# Altium PCB PCB1.PcbDoc (part 2 of 2)
Units mil, origin at the board's own origin, x right, y up, seen from the top; angles counter-clockwise.
Board outline 6000 x 4000 mil, 2 copper layers (Top Layer, Bottom Layer); 89 components, 126 nets, 437 pads, 0 vias.
Unrouted connection lines stored in the file: 287.
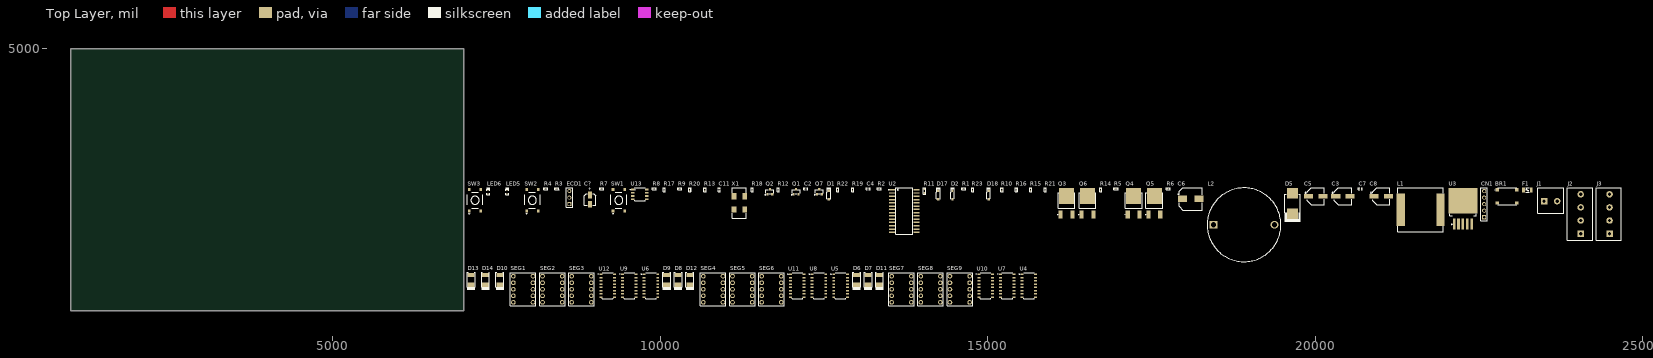
[diagram p0: Top Layer view]

## Part data (continued)
R15 R17 R19 R21 R22: library part RC0402FR-071K5L, "RES 1.5K OHM 1% 1/16W 0402", Case Code (Imperial)=0402, Case Code (Metric)=1005, LCSC Part Number=C114759, Manufacturer=Yageo, Max Operating Temperature=155°C, Max Power Dissipation=63mW, Min Operating Temperature=-55°C, Package Quantity=1, Power Rating=62.5mW, Resistance=1.5kR, Resistance Tolerance=1%, Resistor Type="Thick Film", Supplier Part Number 1=311-1.50KLRCT-ND, Temperature Coefficient=100ppm/°C, Voltage Rating=50V, Case/Package=0402, Category="Chip SMD Resistors", ComponentLink1Description=https://datasheet.ciiva.com/11808/0900766b80c66297-11808238.pdf?src-supplier=RSComponents, ComponentLink1URL=https://datasheet.ciiva.com/11808/0900766b80c66297-11808238.pdf?src-supplier=RSComponents, ComponentLink2Description=https://datasheet.ciiva.com/46394/1018594-46394950.pdf?src-supplier=Element14, ComponentLink2URL=https://datasheet.ciiva.com/46394/1018594-46394950.pdf?src-supplier=Element14, ComponentLink3Description=https://datasheet.ciiva.com/2453/pyu-r-int-thick-7-2453440.pdf?src-supplier=Digi-Key, ComponentLink3URL=https://datasheet.ciiva.com/2453/pyu-r-int-thick-7-2453440.pdf?src-supplier=Digi-Key, ComponentLink4Description=https://datasheet.ciiva.com/2453/pyu-r-int-thick-7-2453441.pdf?src-supplier=Digi-Key, ComponentLink4URL=https://datasheet.ciiva.com/2453/pyu-r-int-thick-7-2453441.pdf?src-supplier=Digi-Key, ComponentLink5Description=https://datasheet.ciiva.com/2453/pyu-r-int-thick-7-2453439.pdf?src-supplier=Digi-Key, ComponentLink5URL=https://datasheet.ciiva.com/2453/pyu-r-int-thick-7-2453439.pdf?src-supplier=Digi-Key, ComponentLink6Description=https://datasheet.ciiva.com/12558/pyu-rc0402-51-rohs-l-6-r-8721-12558542.pdf?src-supplier=Mouser, ComponentLink6URL=https://datasheet.ciiva.com/12558/pyu-rc0402-51-rohs-l-6-r-8721-12558542.pdf?src-supplier=Mouser, ComponentLink7Description=https://datasheet.ciiva.com/7849/1018594-7849863.pdf?src-supplier=Element14, ComponentLink7URL=https://datasheet.ciiva.com/7849/1018594-7849863.pdf?src-supplier=Element14, ComponentLink8Description=https://datasheet.ciiva.com/7849/1018594-7849864.pdf?src-supplier=Element14, ComponentLink8URL=https://datasheet.ciiva.com/7849/1018594-7849864.pdf?src-supplier=Element14, ComponentLink9Description=https://datasheet.ciiva.com/15189/getdatasheetpartid-323992-15189370.pdf?src-supplier=Verical, ComponentLink9URL=https://datasheet.ciiva.com/15189/getdatasheetpartid-323992-15189370.pdf?src-supplier=Verical, Construction=Rectangular, Depth=0.5mm, Features="Moisture Resistant", Height=0.016inch, Lead Free="Lead Free", Length=1mm, Manufacturer Part Number=RC0402FR-071K5L, Military Standard=Not, Number of Terminations=2, Packaging="Tape and Reel", Pricing 1="1=0.10000, 10=0.01500, 100=0.00610, 1000=0.00275, 2500=0.00239, 5000=0.00197 (USD)", REACH SVHC="No SVHC", RoHS=Yes, RoHS Compliant=Yes, Series=RC, Size Code=0402, Stock 1=2832947, Supplier 1=Digi-Key, Technology="THICK FILM", Termination=SMD/SMT, Tolerance=1%, Width=0.02inch
R18: library part RC0402FR-0710KL, "RES 10K OHM 1% 1/16W 0402", Case Code (Imperial)=0402, Case Code (Metric)=1005, LCSC Part Number=C60490, Manufacturer=Yageo, Max Operating Temperature=155°C, Max Power Dissipation=63mW, Min Operating Temperature=-55°C, Power Rating=62.5mW, Resistance=10kR, Resistance Tolerance=1%, Resistor Type="Thick Film", Supplier Part Number 1=603-RC0402FR-0710KL, Temperature Coefficient=100ppm/°C, Voltage Rating=50V, Case/Package=0402, Category="Chip SMD Resistors", ComponentLink1Description=https://datasheet.ciiva.com/7660/38568-7660787.pdf?src-supplier=Element14, ComponentLink1URL=https://datasheet.ciiva.com/7660/38568-7660787.pdf?src-supplier=Element14, ComponentLink2Description=https://datasheet.ciiva.com/7849/1686128-7849814.pdf?src-supplier=Element14, ComponentLink2URL=https://datasheet.ciiva.com/7849/1686128-7849814.pdf?src-supplier=Element14, ComponentLink3Description=https://datasheet.ciiva.com/7983/1018594-7983486.pdf?src-supplier=Element14, ComponentLink3URL=https://datasheet.ciiva.com/7983/1018594-7983486.pdf?src-supplier=Element14, ComponentLink4Description=https://datasheet.ciiva.com/22747/1018594-22747512.pdf?src-supplier=Element14, ComponentLink4URL=https://datasheet.ciiva.com/22747/1018594-22747512.pdf?src-supplier=Element14, ComponentLink5Description=https://datasheet.ciiva.com/12667/pyu-rc0402-51-rohs-l-6-r-12667067.pdf?src-supplier=Mouser, ComponentLink5URL=https://datasheet.ciiva.com/12667/pyu-rc0402-51-rohs-l-6-r-12667067.pdf?src-supplier=Mouser, ComponentLink6Description=https://datasheet.ciiva.com/7849/1784430-7849813.pdf?src-supplier=Element14, ComponentLink6URL=https://datasheet.ciiva.com/7849/1784430-7849813.pdf?src-supplier=Element14, ComponentLink7Description=https://datasheet.ciiva.com/7849/1784430-7849815.pdf?src-supplier=Element14, ComponentLink7URL=https://datasheet.ciiva.com/7849/1784430-7849815.pdf?src-supplier=Element14, Construction=Rectangular, Depth=0.5mm, Features="Moisture Resistant", Height=0.32mm, Item Type=Resistor, Lead Free="Lead Free", Lead Pitch=0.2mm, Length=1mm, Manufacturer Part Number=RC0402FR-0710KL, Military Standard=Not, Number of Pins=2, Number of Terminations=2, Packaging="Tape and Reel", Pricing 1="1=0.10000, 10=0.01400, 50=0.01400, 100=0.00500, 1000=0.00300, 10000=0.00200 (USD)", REACH SVHC="No SVHC", RoHS=Yes, RoHS Compliant=Yes, Series=RC, Stock 1=18648329, Supplier 1=Mouser, Termination=SMD/SMT, Tolerance=1%, Voltage Rating (DC)=50V, Width=0.5mm, Working Voltage=50V
SEG1 SEG2 SEG3 SEG4 SEG5 SEG6 SEG7 SEG8 SEG9: "DISPLAY 7SEG 0.39\" SGL RED 10DIP", Manufacturer=Kingbright, Supplier Part Number=SC39-11SURKWA-ND, ComponentLink1Description=https://datasheet.ciiva.com/26291/sc39-11surkwa-26291740.pdf?src-supplier=Digikey, ComponentLink1URL=https://datasheet.ciiva.com/26291/sc39-11surkwa-26291740.pdf?src-supplier=Digikey, ComponentLink2Description=https://datasheet.ciiva.com/16375/sc39-11surkwa-246106-16375578.pdf?src-supplier=Mouser, ComponentLink2URL=https://datasheet.ciiva.com/16375/sc39-11surkwa-246106-16375578.pdf?src-supplier=Mouser, ComponentLink3Description=https://datasheet.ciiva.com/1317/1519922-1317612.pdf?src-supplier=Newark, ComponentLink3URL=https://datasheet.ciiva.com/1317/1519922-1317612.pdf?src-supplier=Newark, ComponentLink4Description=https://datasheet.ciiva.com/29367/001050548-da-01-en-led-anzeige-7-seg-rot-sc39-11surkwa-29367379.pdf?src-supplier=Conrad, ComponentLink4URL=https://datasheet.ciiva.com/29367/001050548-da-01-en-led-anzeige-7-seg-rot-sc39-11surkwa-29367379.pdf?src-supplier=Conrad, ComponentLink5Description=https://datasheet.ciiva.com/1535/1519922-1535149.pdf?src-supplier=Element14, ComponentLink5URL=https://datasheet.ciiva.com/1535/1519922-1535149.pdf?src-supplier=Element14, Item Type="LED Displays", Manufacturer Part Number=SC39-11SURKWA, Pricing="1=1.86, 39=1.23821, 117=0.95282, 507=0.86132, 1014=0.74021, 2028=0.69983, 5031=0.68368, 10023=0.67291 (USD)", RoHS=Yes, Stock=3214, Supplier=Digikey
SW1 SW2 SW3: "-25℃~+85℃ 6mm 5mm Round Button 50mA Brick nogging 6mm SPST 100MΩ 100000 250gf@±30gf 12V SMD Tactile Switches ROHS", LCSC Part Number=C127509, Manufacturer="Korean Hroparts Elec", Package=SMD, ComponentLink1Description=LCSC, ComponentLink1URL=https://www.lcsc.com/product-detail/span-style-background-color-ff0-Tactile-span-Switches_Korean-Hroparts-Elec-K2-1102SP-C4SC-04_C127509.html, Item Type=Switch, Manufacturer Part Number=K2-1102SP-C4SC-04
U2: "IC MCU 8BIT 7KB FLASH 28SOIC", Manufacturer="Microchip Technology", Package=28-SOIC, ComponentLink1Description=LCSC, ComponentLink1URL=https://www.digikey.com/en/products/detail/microchip-technology/PIC16F873A-I-SO/446135, Item Type=IC, Manufacturer Part Number=PIC16F873A-I/SO
U3: "IC REG BUCK 5V 3A TO263-5", Case/Package=TO-263-6, LCSC Part Number=C34465, Manufacturer="TI National Semiconductor", Max Operating Temperature=125°C, Max Supply Voltage=40V, Min Input Voltage=4V, Min Operating Temperature=-40°C, Nominal Output Voltage=5V, Output Current=3A, Quiescent Current=5mA, Supplier Part Number 1=926-LM2576SX-5.0NOPB, Switching Frequency=52kHz, Category="Voltage Regulators - Switching", ComponentLink1Description=https://datasheet.ciiva.com/41457/001013741-da-01-en-ic-reg-bu-lm2576sx-5-0-nopb-to-263-5-tid-41457614.pdf?src-supplier=Conrad, ComponentLink1URL=https://datasheet.ciiva.com/41457/001013741-da-01-en-ic-reg-bu-lm2576sx-5-0-nopb-to-263-5-tid-41457614.pdf?src-supplier=Conrad, Efficiency=77%, Item Type=IC, Lead Free="Contains Lead", Manufacturer Part Number=LM2576SX-5.0/NOPB, Mounting Technology="Surface Mount", Number of Outputs=1, Output Type=Fixed, Output Voltage=5V, Packaging="Tape and Reel", Pins=5, Pricing 1="1=4.06000, 10=3.64000, 50=3.44000, 100=2.98000, 1000=2.54000, 10000=2.54000 (USD)", Reach SVHC Compliant=No, RoHS=Yes, RoHS Compliant=Yes, Series="SIMPLE SWITCHER®", Stock 1=734, Supplier 1=Mouser, Synchronous Rectifier=No
U4 U5 U6 U7 U8 U9 U10 U11 U12: "IC 8BIT SHFT REG OUT LTCH 16SOIC", Manufacturer="Texas Instruments", Supplier Part Number=595-SN74LS595DR, ComponentLink1Description=https://datasheet.ciiva.com/14296/sn74ls595-14296811.pdf?src-supplier=Avnet, ComponentLink1URL=https://datasheet.ciiva.com/14296/sn74ls595-14296811.pdf?src-supplier=Avnet, ComponentLink2Description=https://datasheet.ciiva.com/1886/sn74ls595-1886573.pdf?src-supplier=Digikey, ComponentLink2URL=https://datasheet.ciiva.com/1886/sn74ls595-1886573.pdf?src-supplier=Digikey, ComponentLink3Description=https://datasheet.ciiva.com/1886/sn74ls595-1886574.pdf?src-supplier=Digikey, ComponentLink3URL=https://datasheet.ciiva.com/1886/sn74ls595-1886574.pdf?src-supplier=Digikey, ComponentLink4Description=https://datasheet.ciiva.com/1886/sn74ls595-1886575.pdf?src-supplier=Digikey, ComponentLink4URL=https://datasheet.ciiva.com/1886/sn74ls595-1886575.pdf?src-supplier=Digikey, Item Type=IC, Manufacturer Part Number=SN74LS595DR, Pricing="1=11.61, 10=10.48, 50=10, 100=8.68, 1000=6.58, 10000=6.34 (USD)", RoHS=Yes, Stock=2196, Supplier=Mouser
U13: "IC OPAMP GP 2 CIRCUIT 8SOIC", Manufacturer=STMicroelectronics, Supplier Part Number=511-LM358DT, ComponentLink1Description=https://datasheet.ciiva.com/15129/getdatasheetpartid-39583-15129679.pdf?src-supplier=Verical, ComponentLink1URL=https://datasheet.ciiva.com/15129/getdatasheetpartid-39583-15129679.pdf?src-supplier=Verical, ComponentLink2Description=https://datasheet.ciiva.com/29306/155599-da-01-en-op-verst-lm358dt-stm-29306826.pdf?src-supplier=Conrad, ComponentLink2URL=https://datasheet.ciiva.com/29306/155599-da-01-en-op-verst-lm358dt-stm-29306826.pdf?src-supplier=Conrad, ComponentLink3Description=https://datasheet.ciiva.com/14544/70013561-14544747.pdf?src-supplier=Allied+Electronics, ComponentLink3URL=https://datasheet.ciiva.com/14544/70013561-14544747.pdf?src-supplier=Allied+Electronics, ComponentLink4Description=https://datasheet.ciiva.com/16371/cd00000464-16371207.pdf?src-supplier=Future+Electronics, ComponentLink4URL=https://datasheet.ciiva.com/16371/cd00000464-16371207.pdf?src-supplier=Future+Electronics, ComponentLink5Description=https://datasheet.ciiva.com/1795/cd00000464-1795490.pdf?src-supplier=Digikey, ComponentLink5URL=https://datasheet.ciiva.com/1795/cd00000464-1795490.pdf?src-supplier=Digikey, ComponentLink6Description=https://datasheet.ciiva.com/1795/cd00000464-1795491.pdf?src-supplier=Digikey, ComponentLink6URL=https://datasheet.ciiva.com/1795/cd00000464-1795491.pdf?src-supplier=Digikey, ComponentLink7Description=https://datasheet.ciiva.com/1795/cd00000464-1795492.pdf?src-supplier=Digikey, ComponentLink7URL=https://datasheet.ciiva.com/1795/cd00000464-1795492.pdf?src-supplier=Digikey, Item Type=Opam, Manufacturer Part Number=LM358DT, Pricing="1=0.39, 10=0.266, 50=0.266, 100=0.155, 1000=0.097, 10000=0.074 (USD)", RoHS=Yes, Stock=69809, Supplier=Mouser
X1: "CRYSTAL 4.0000MHZ 20PF SMD", Manufacturer="ECS International", Supplier Part Number=XC587CT-ND, Item Type=Crystals, Manufacturer Part Number=ECS-40-20-18-TR, Pricing="1=2.5, 10=2.439, 50=2.323, 100=2.0326, 500=1.97456 (USD)", RoHS=Yes, Stock=10131, Supplier=Digikey

## Nets (pads, with @x,y where several pads share a name; then routed paths per layer and width w, separated by ;. In a path a pad name is that pad's centre, name@x,y a point inside that pad or via, vN(x,y) a via of type N, cw(c..) or ccw(c..) an arc to the next point about the centre after c; other vN are vias at no path point)
2Va: D10.2 SEG1.3 SEG1.8 SEG2.3 SEG2.8 SEG3.3 SEG3.8
2Vb: D12.2 SEG4.3 SEG4.8 SEG5.3 SEG5.8 SEG6.3 SEG6.8
2Vc: D11.2 SEG7.3 SEG7.8 SEG8.3 SEG8.8 SEG9.3 SEG9.8
+24V: BR1.1 C7.2 C8.1 J3.2 L2.1 R5.2 R6.2 U3.1
C: CN1.5 U2.27
D: CN1.4 U2.28
EC1: ECD1.3 U2.22
EC2: ECD1.1 U2.23
ERR: U2.25 U13.1
FB: C2.2 C3.1 C5.1 CN1.2 L1.2 R1.2 R2.1 R3.1 R4.1 R8.2 R18.2 R20.2 U2.20 U3.4 U4.10 U4.16 U5.10 U5.16 U6.9 U6.10 U6.16 U7.10 U7.16 U8.10 U8.16 U9.9 U9.10 U9.14 U9.16 U10.10 U10.16 U11.10 U11.16 U12.9 U12.10 U12.14 U12.16 U13.8
GND: BR1.3 C2.1 C3.2 C4.1 C5.2 C6.2 C7.1 C8.2 C11.1 C?.2 CN1.1 D5.2 D6.1 D9.1 D13.1 ECD1.2 J2.1 J2.2 Q1.2 Q2.2 Q7.2 R7.1 R10.1 R11.1 R16.1 R17.1 SW1.3 SW1.4 SW2.3 SW2.4 SW3.3 SW3.4 U2.8 U2.19 U3.3 U3.5 U3.6 U4.8 U4.13 U5.8 U5.13 U6.8 U6.13 U7.8 U7.13 U8.8 U8.13 U9.8 U9.13 U10.8 U10.13 U11.8 U11.13 U12.8 U12.13 U13.4
GS: SW1.1 SW1.2 U2.21
MCLR: CN1.3 R1.1 SW3.1 SW3.2 U2.1
MD: D17.2 U2.12 U13.6
MOF: R12.2 U2.5
NetBR1_2: BR1.2 F1.1
NetBR1_4: BR1.4 J3.4
NetC6_1: C6.1 L2.2 Q4.3 Q5.3
NetC?_1: C?.1 R9.1 U13.2
NetD1_1: D1.1 D18.1 Q6.1 R16.2 R19.2
NetD1_2: D1.2 D2.2 Q2.3
NetD2_1: D2.1 D17.1 Q3.1 R10.2 R21.2
NetD5_1: D5.1 L1.1 U3.2
NetD6_2: D6.2 D7.1
NetD7_2: D7.2 D11.1
NetD8_1: D8.1 D9.2
NetD8_2: D8.2 D12.1
NetD10_1: D10.1 D14.2
NetD13_2: D13.2 D14.1
NetD18_2: D18.2 R13.1 U13.7
NetF1_2: F1.2 J3.3
NetJ2_4: J2.4 Q3.2 Q4.2
NetJ3_1: J3.1 Q5.2 Q6.2
NetLED5_1: LED5.1 R3.2
NetLED6_1: LED6.1 R4.2
NetQ1_1: Q1.1 R13.2
NetQ1_3: Q1.3 Q7.1 R23.1
NetQ2_1: Q2.1 R12.1
NetQ3_3: Q3.3 Q6.3 R9.2 R11.2
NetQ4_1: Q4.1 R5.1 R23.2
NetQ5_1: Q5.1 R6.1 R14.2
NetQ7_3: Q7.3 R14.1
NetR7_2: R7.2 R8.1 U13.3
NetR15_2: R15.2 R21.1
NetR17_2: R17.2 R20.1 U13.5
NetR19_1: R19.1 R22.2
NetSEG1_1: SEG1.1 U12.6
NetSEG1_2: SEG1.2 U12.5
NetSEG1_4: SEG1.4 U12.4
NetSEG1_5: SEG1.5 U12.3
NetSEG1_7: SEG1.7 U12.2
NetSEG1_9: SEG1.9 U12.1
NetSEG1_10: SEG1.10 U12.15
NetSEG2_1: SEG2.1 U9.6
NetSEG2_2: SEG2.2 U9.5
NetSEG2_4: SEG2.4 U9.4
NetSEG2_5: SEG2.5 U9.3
NetSEG2_7: SEG2.7 U9.2
NetSEG2_9: SEG2.9 U9.1
NetSEG2_10: SEG2.10 U9.15
NetSEG3_1: SEG3.1 U6.6
NetSEG3_2: SEG3.2 U6.5
NetSEG3_4: SEG3.4 U6.4
NetSEG3_5: SEG3.5 U6.3
NetSEG3_7: SEG3.7 U6.2
NetSEG3_9: SEG3.9 U6.1
NetSEG3_10: SEG3.10 U6.15
NetSEG4_1: SEG4.1 U11.6
NetSEG4_2: SEG4.2 U11.5
NetSEG4_4: SEG4.4 U11.4
NetSEG4_5: SEG4.5 U11.3
NetSEG4_7: SEG4.7 U11.2
NetSEG4_9: SEG4.9 U11.1
NetSEG4_10: SEG4.10 U11.15
NetSEG5_1: SEG5.1 U8.6
NetSEG5_2: SEG5.2 U8.5
NetSEG5_4: SEG5.4 U8.4
NetSEG5_5: SEG5.5 U8.3
NetSEG5_7: SEG5.7 U8.2
NetSEG5_9: SEG5.9 U8.1
NetSEG5_10: SEG5.10 U8.15
NetSEG6_1: SEG6.1 U5.6
NetSEG6_2: SEG6.2 U5.5
NetSEG6_4: SEG6.4 U5.4
NetSEG6_5: SEG6.5 U5.3
NetSEG6_7: SEG6.7 U5.2
NetSEG6_9: SEG6.9 U5.1
NetSEG6_10: SEG6.10 U5.15
NetSEG7_1: SEG7.1 U10.6
NetSEG7_2: SEG7.2 U10.5
NetSEG7_4: SEG7.4 U10.4
NetSEG7_5: SEG7.5 U10.3
NetSEG7_7: SEG7.7 U10.2
NetSEG7_9: SEG7.9 U10.1
NetSEG7_10: SEG7.10 U10.15
NetSEG8_1: SEG8.1 U7.6
NetSEG8_2: SEG8.2 U7.5
NetSEG8_4: SEG8.4 U7.4
NetSEG8_5: SEG8.5 U7.3
NetSEG8_7: SEG8.7 U7.2
NetSEG8_9: SEG8.9 U7.1
NetSEG8_10: SEG8.10 U7.15
NetSEG9_1: SEG9.1 U4.6
NetSEG9_2: SEG9.2 U4.5
NetSEG9_4: SEG9.4 U4.4
NetSEG9_5: SEG9.5 U4.3
NetSEG9_7: SEG9.7 U4.2
NetSEG9_9: SEG9.9 U4.1
NetSEG9_10: SEG9.10 U4.15
NetU2_9: U2.9 X1.1
NetU2_10: U2.10 X1.2
OFLED: LED5.2 U2.3
ONLED: LED6.2 U2.2
PWM: R15.1 R22.1 U2.13
RCK: U2.17 U4.12 U5.12 U6.12 U7.12 U8.12 U9.12 U10.12 U11.12 U12.12
RQ7_4: U4.9 U7.14
RQ7_5: U5.9 U8.14
RQ7_7: U7.9 U10.14
RQ7_8: U8.9 U11.14
RST_SW: C4.2 J1.1 R2.2 U2.4
SCL: U2.14 U6.11 U9.11 U12.11
SCL_C: U2.18 U5.11
SCL_D: U2.16 U4.11 U7.11 U10.11
SDA: U2.15 U4.14 U5.14 U6.14 U8.11 U11.11
SEL: SW2.1 SW2.2 U2.26
TICK1: C11.2 J1.2 R18.1 U2.11
pads on no net: J2.3 SEG1.6 SEG2.6 SEG3.6 SEG4.6 SEG5.6 SEG6.6 SEG7.6 SEG8.6 SEG9.6 U2.6 U2.7 U2.24 U4.7 U5.7 U6.7 U7.7 U8.7 U9.7 U10.7 U10.9 U11.7 U11.9 U12.7

## Text inside footprints (layer, text, board x,y; h text height)
C?: Top Overlay "+" at 8949.68,2828.86 h48 r90